# Altium PCB PCB.PcbDoc (part 1 of 2)
Units mil, origin at the board's own origin, x right, y up, seen from the top; angles counter-clockwise.
Board outline 1965.12 x 2985.07 mil, 4 copper layers (Top Layer, digital, gnd, Bottom Layer), stack 23.756 mil thick; 141 components, 79 nets, 449 pads, 482 vias.
Unrouted connection lines stored in the file: 63.
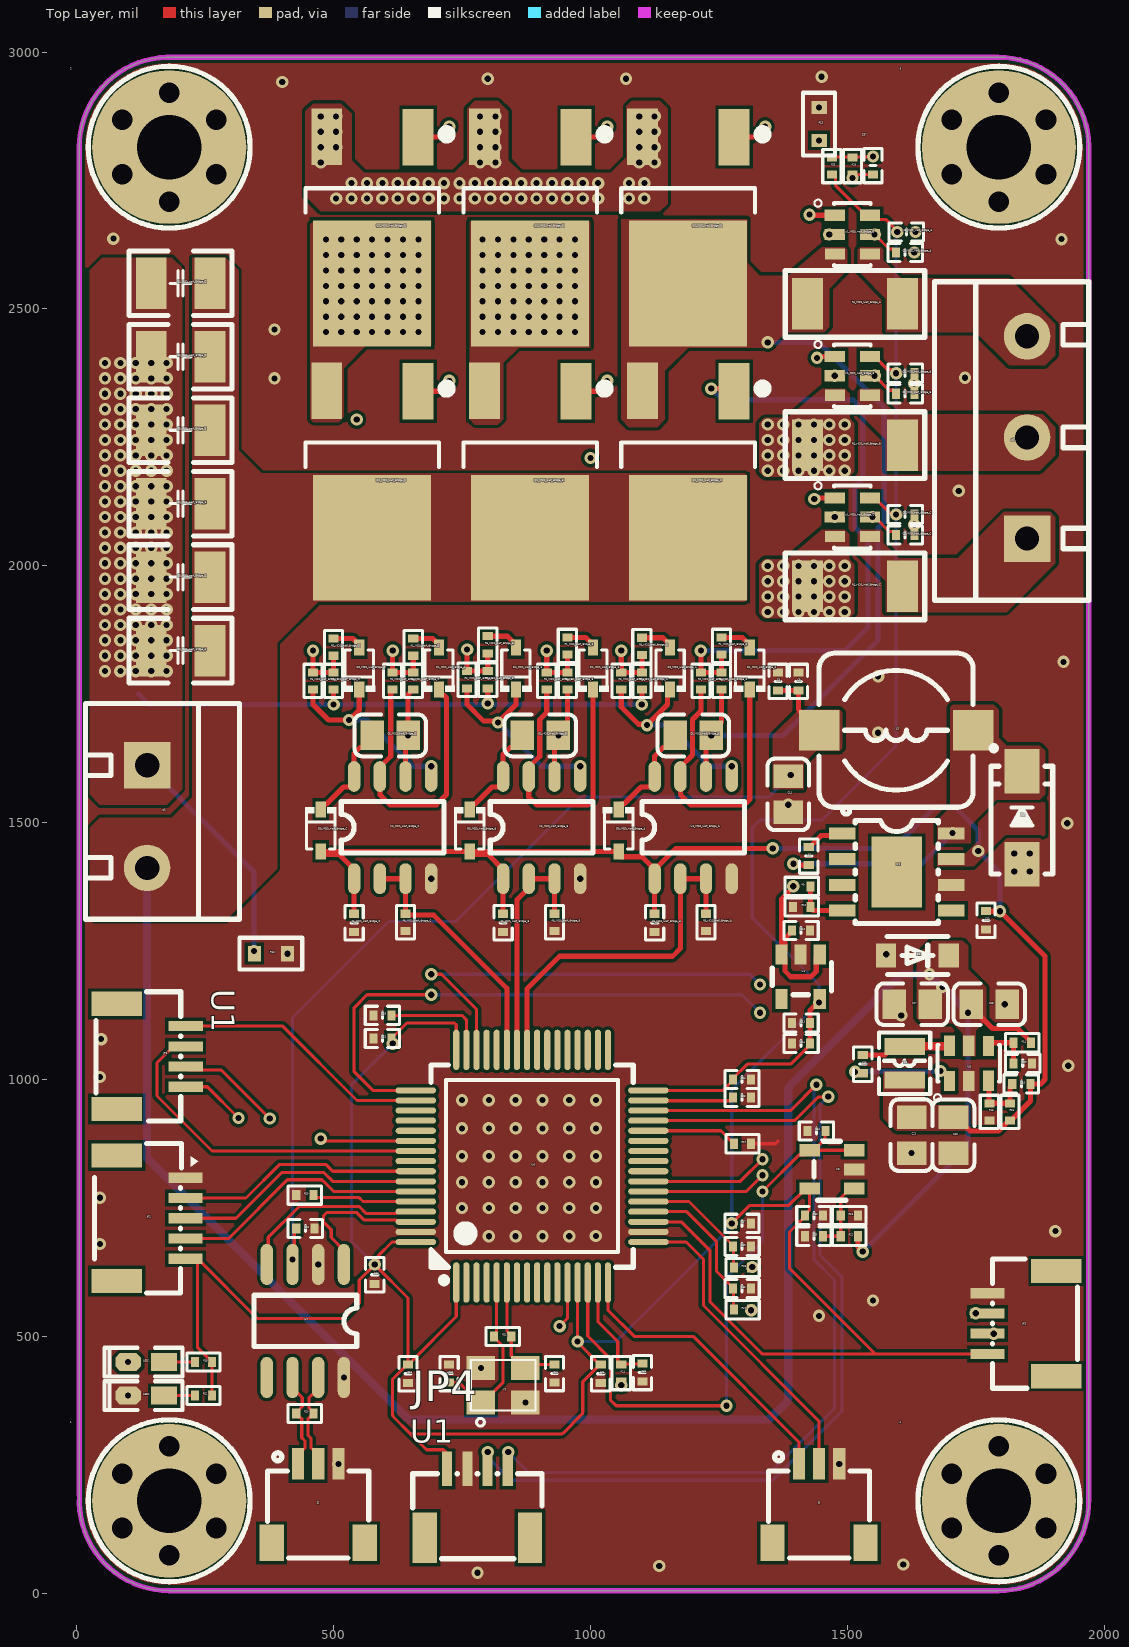
[diagram p0: Top Layer view]
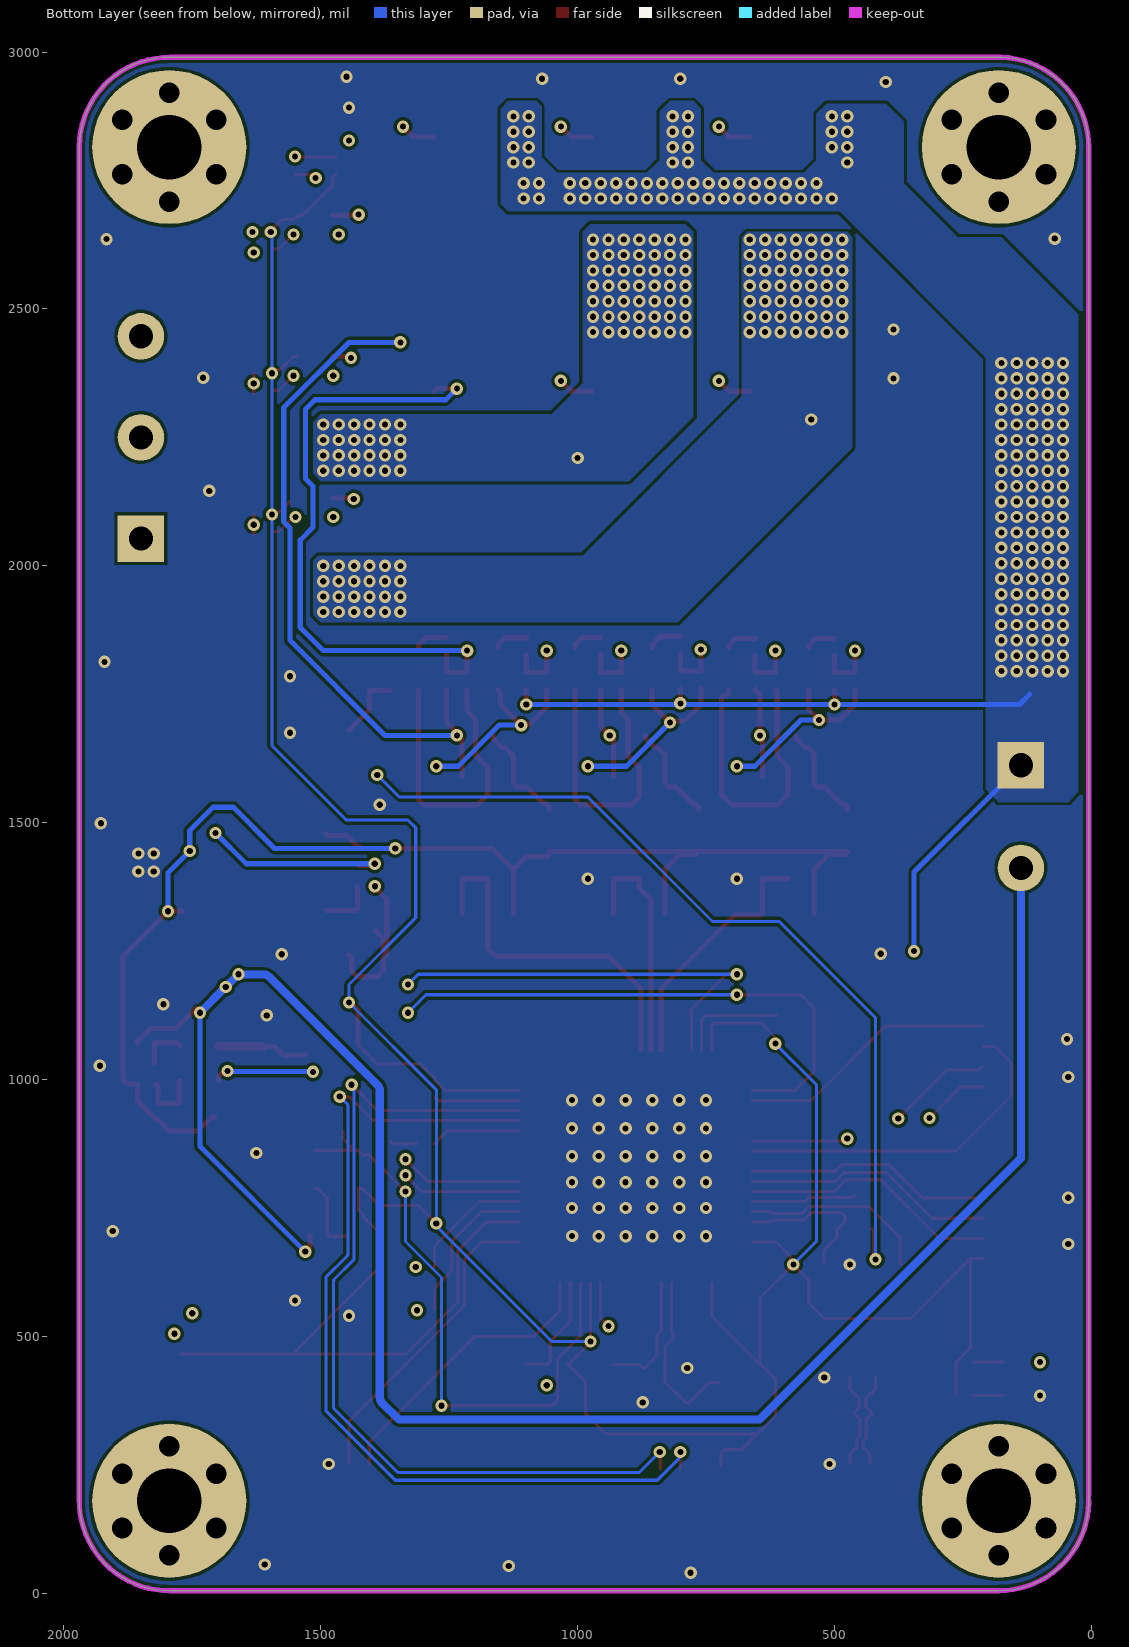
[diagram p1: Bottom Layer view, seen from below]
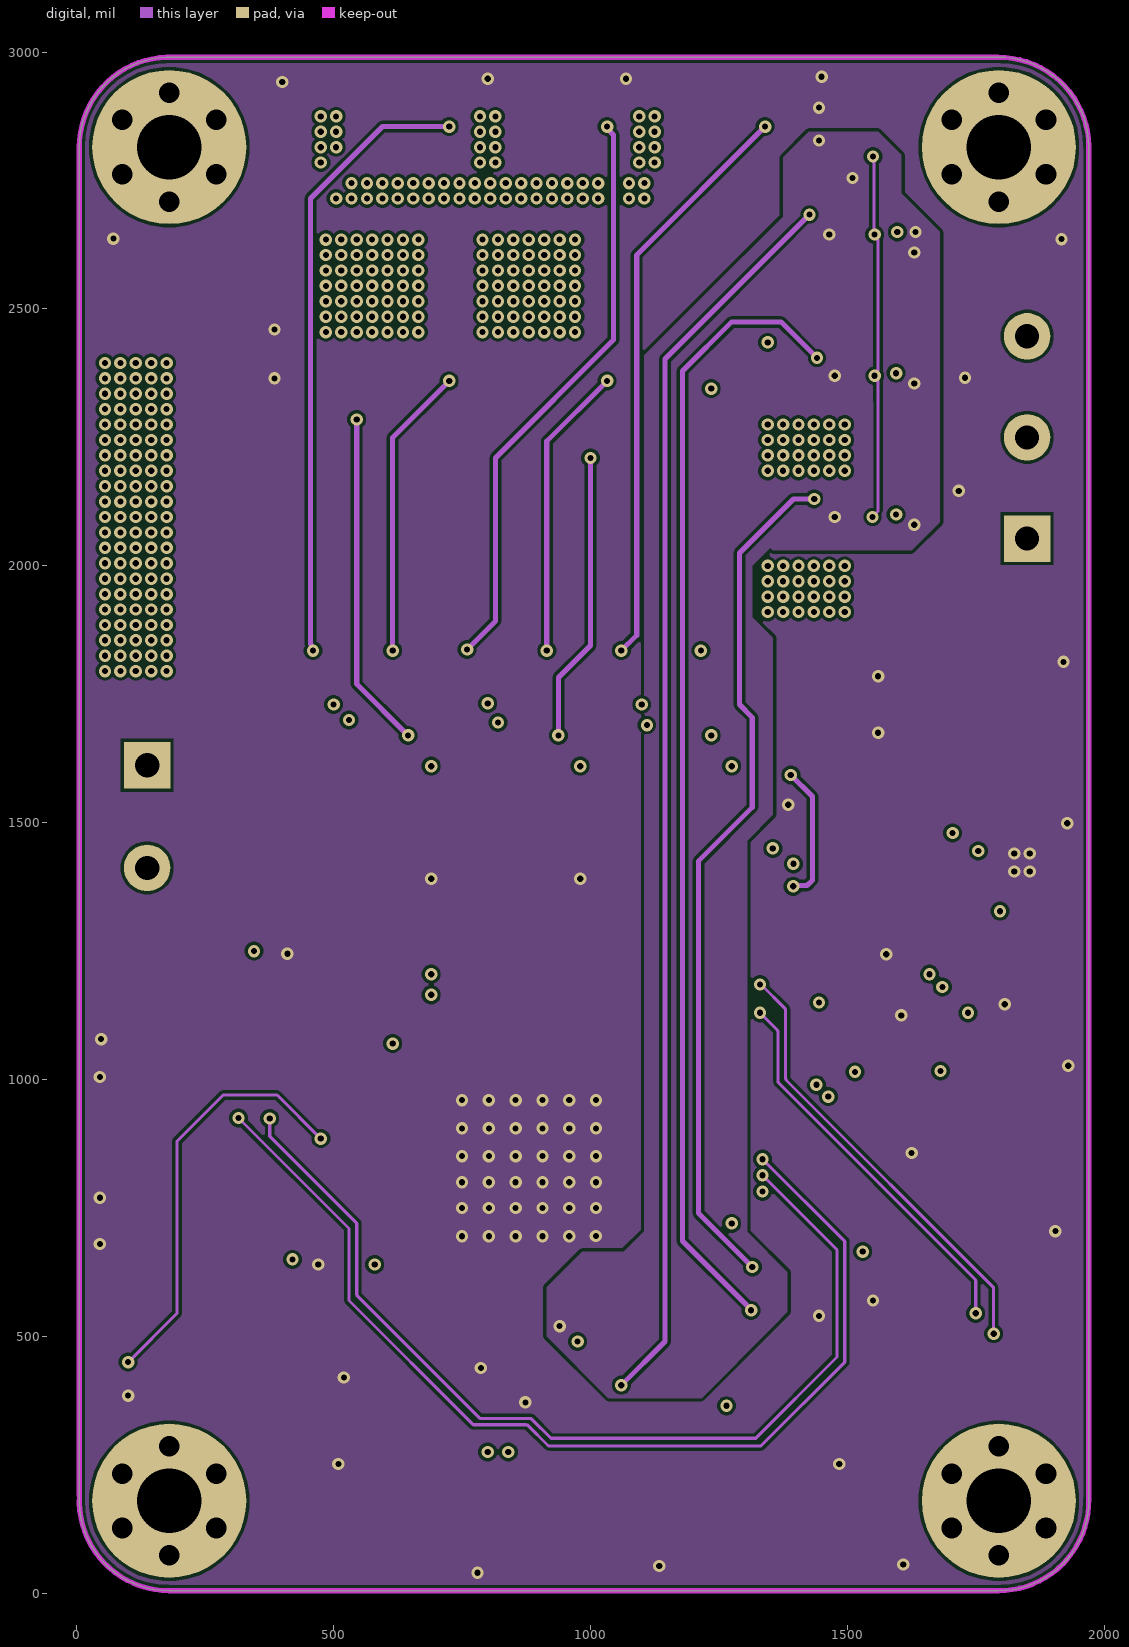
[diagram p2: digital]
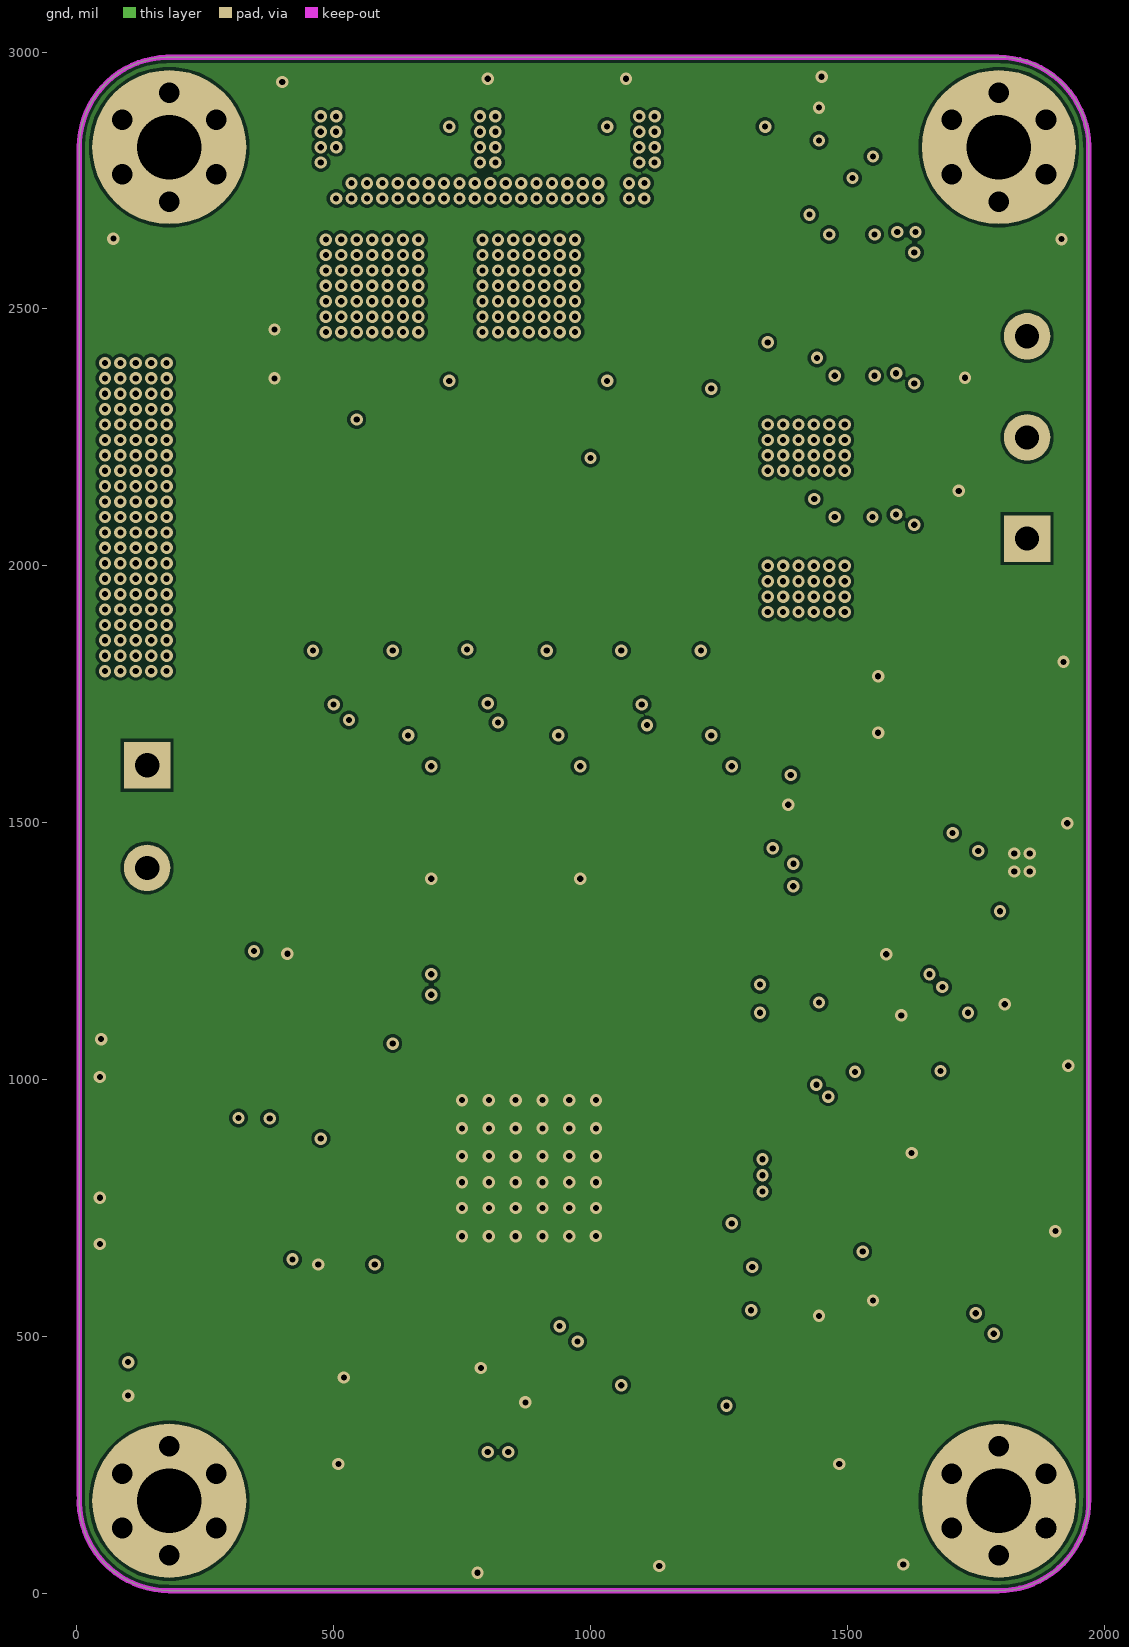
[diagram p3: gnd]

## Layer stack, top to bottom
Top Solder: solder mask 0.4, Solder Resist, Dk 3.5
Top Layer: signal copper 1.4
Dielectric 2: prepreg 2.8, PP-006, Dk 4.1
digital: signal copper 1.378
Dielectric 1: dielectric 12.6, FR-4, Dk 4.8
gnd: signal copper 1.378
Dielectric 3: prepreg 2.8, PP-006, Dk 4.1
Bottom Layer: signal copper 1.4
Bottom Solder: solder mask 0.4, Solder Resist, Dk 3.5

## Board outline
5.21,189.99 5,2815 4.93,2815 cw(c180,2815) 175,2990 1793,2990 cw(c1795,2815) 1970,2816.99 1970.05,2816.99 1970.05,183 cw(c1795,180) 1794,4.93 180,4.93 cw(c180,180)

## Design rules (kind name [scope] priority, off if disabled: settings)
Clearance [All] p1: gap=6 ignorepadtopadclearanceinfootprint=TRUE
DiffPairsRouting DiffPair_DiffPairsRouting [All] p1: maxlimit=6 minlimit=6 mostfreqgap=6 toplayer_minwidth=6 toplayer_maxwidth=6 toplayer_prefwidth=6 midlayer1_minwidth=6 midlayer1_maxwidth=6 midlayer1_prefwidth=6 midlayer2_minwidth=6 midlayer2_maxwidth=6 midlayer2_prefwidth=6 bottomlayer_minwidth=6 bottomlayer_maxwidth=6 bottomlayer_prefwidth=6 maxuncoupledlength=500
MatchedLengths DiffPair_MatchedLengths [InDifferentialPair ('CAN_X')] p1: tolerance=10 checknetsindiffpair=FALSE checkdiffpairvsdiffpair=TRUE checkxsignals=TRUE checkothers=TRUE
MatchedLengths [InDifferentialPair ('CAN_X')] p2: tolerance=1000 checknetsindiffpair=FALSE checkdiffpairvsdiffpair=TRUE checkxsignals=TRUE checkothers=TRUE
MinimumSolderMaskSliver [All] p1 off: minsoldermaskwidth=10
PolygonConnect PolygonConnect_1 [All] p1: connectstyle=Direct reliefconductorwidth=10 reliefentries=4 polygonreliefangle="90 Angle" airgapwidth=10
PolygonConnect [All] p2: connectstyle=Relief reliefconductorwidth=10 reliefentries=4 polygonreliefangle="90 Angle" airgapwidth=10
RoutingVias [All] p1: holewidth=28 width=50 viastyle="Through Hole" minholewidth=28 minwidth=50 maxholewidth=28 maxwidth=50
SilkToSilkClearance [All] p1 off: silktosilkclearance=10
SilkToSolderMaskClearance [IsPad] p1 off: minsilkscreentomaskgap=10 clearancetoexposedcopper=TRUE
SolderMaskExpansion [All] p1 off: expansion=4 istentingtop=FALSE
Width [All] p1: maxlimit=20 minlimit=4 preferedwidth=6
26 further rules are at their usual default settings.

## Classes and differential pairs
component class control: 1 2 3 4
channel class single_bridge: MOS_Half_Bridge_A MOS_Half_Bridge_B MOS_Half_Bridge_C
component class slyFOC_module: C33 C34 C35 C36 C37 C38 C39 JP2 JP3 JP4 p2 R22 R23 R24 R25 R26 R27 R28 U8
component class my_Power: C7 C8 C9 C10 C11 C12 C13 C14 C15 C16 C17 C18 C19 C20 C21 D4 D5 L1 L2 LED1 p1 R9 R10 R11 R12 R13 R14 R15 R16 U3 U4 U5
component class MOS_Half_Bridge_C: C1_MOS_Half_Bridge_C C2_MOS_Half_Bridge_C C3_MOS_Half_Bridge_C C4_MOS_Half_Bridge_C C5_MOS_Half_Bridge_C C6_MOS_Half_Bridge_C D1_MOS_Half_Bridge_C D2_MOS_Half_Bridge_C D3_MOS_Half_Bridge_C Q1_MOS_Half_Bridge_C Q2_MOS_Half_Bridge_C R1_MOS_Half_Bridge_C R2_MOS_Half_Bridge_C R3_MOS_Half_Bridge_C R4_MOS_Half_Bridge_C R5_MOS_Half_Bridge_C R6_MOS_Half_Bridge_C R7_MOS_Half_Bridge_C R8_MOS_Half_Bridge_C U1_MOS_Half_Bridge_C U2_MOS_Half_Bridge_C
component class MOS_Half_Bridge_B: C1_MOS_Half_Bridge_B C2_MOS_Half_Bridge_B C3_MOS_Half_Bridge_B C4_MOS_Half_Bridge_B C5_MOS_Half_Bridge_B C6_MOS_Half_Bridge_B D1_MOS_Half_Bridge_B D2_MOS_Half_Bridge_B D3_MOS_Half_Bridge_B Q1_MOS_Half_Bridge_B Q2_MOS_Half_Bridge_B R1_MOS_Half_Bridge_B R2_MOS_Half_Bridge_B R3_MOS_Half_Bridge_B R4_MOS_Half_Bridge_B R5_MOS_Half_Bridge_B R6_MOS_Half_Bridge_B R7_MOS_Half_Bridge_B R8_MOS_Half_Bridge_B U1_MOS_Half_Bridge_B U2_MOS_Half_Bridge_B
component class MOS_Half_Bridge_A: C1_MOS_Half_Bridge_A C2_MOS_Half_Bridge_A C3_MOS_Half_Bridge_A C4_MOS_Half_Bridge_A C5_MOS_Half_Bridge_A C6_MOS_Half_Bridge_A D1_MOS_Half_Bridge_A D2_MOS_Half_Bridge_A D3_MOS_Half_Bridge_A Q1_MOS_Half_Bridge_A Q2_MOS_Half_Bridge_A R1_MOS_Half_Bridge_A R2_MOS_Half_Bridge_A R3_MOS_Half_Bridge_A R4_MOS_Half_Bridge_A R5_MOS_Half_Bridge_A R6_MOS_Half_Bridge_A R7_MOS_Half_Bridge_A R8_MOS_Half_Bridge_A U1_MOS_Half_Bridge_A U2_MOS_Half_Bridge_A
component class MCU: C22 C23 C24 C25 C26 C27 C28 C29 C30 C31 C32 J1 J2 JP1 LED2 R17 R18 R19 R20 R21 U6 U7 Y1
differential pair CAN: +CAN_P -CAN_N
differential pair CAN_X: +CAN_X_P -CAN_X_N

## Components (designator, comment, footprint, x,y, rotation, side; value= is the part's Value field where it differs from the comment)
1 "M3" M3x9+6_N 180,180 r90 top
2 "M3" M3x9+6_N 180,2815 r90 top
3 "M3" M3x9+6_N 1795,2815 r90 top
4 "M3" M3x9+6_N 1795,180 r90 top
C1_MOS_Half_Bridge_A "0402/0.1uF" 0402C 1615,2650 r180 top value=0.1uF (schematic designator C1)
C1_MOS_Half_Bridge_B "0402/0.1uF" 0402C 1612.72,2375 r180 top value=0.1uF (schematic designator C1)
C1_MOS_Half_Bridge_C "0402/0.1uF" 0402C 1612.72,2100 r180 top value=0.1uF (schematic designator C1)
C2_MOS_Half_Bridge_A "0402/0.1uF" 0402C 1612.72,2610 r0 top value=0.1uF (schematic designator C2)
C2_MOS_Half_Bridge_B "0402/0.1uF" 0402C 1612.72,2335 r0 top value=0.1uF (schematic designator C2)
C2_MOS_Half_Bridge_C "0402/0.1uF" 0402C 1612.72,2060 r0 top value=0.1uF (schematic designator C2)
C3_MOS_Half_Bridge_A "1210/10uF 63V 10%" 1210C 202.09,1978 r0 top value="10uF 63V 10%" (schematic designator C3)
C3_MOS_Half_Bridge_B "1210/10uF 63V 10%" 1210C 202.09,2264 r0 top value="10uF 63V 10%" (schematic designator C3)
C3_MOS_Half_Bridge_C "1210/10uF 63V 10%" 1210C 202.09,2407 r0 top value="10uF 63V 10%" (schematic designator C3)
C4_MOS_Half_Bridge_A "1210/10uF 63V 10%" 1210C 202.09,1835 r0 top value="10uF 63V 10%" (schematic designator C4)
C4_MOS_Half_Bridge_B "1210/10uF 63V 10%" 1210C 202.09,2121 r0 top value="10uF 63V 10%" (schematic designator C4)
C4_MOS_Half_Bridge_C "1210/10uF 63V 10%" 1210C 202.09,2550 r0 top value="10uF 63V 10%" (schematic designator C4)
C5_MOS_Half_Bridge_A "0805/150nF/50V" 0805C 1200,1670 r0 top value=150nF/50V (schematic designator C5)
C5_MOS_Half_Bridge_B "0805/150nF/50V" 0805C 902.52,1670 r0 top value=150nF/50V (schematic designator C5)
C5_MOS_Half_Bridge_C "0805/150nF/50V" 0805C 610.04,1670 r0 top value=150nF/50V (schematic designator C5)
C6_MOS_Half_Bridge_A "0402/0.1uF" 0402C 1125,1305 r90 top value=0.1uF (schematic designator C6)
C6_MOS_Half_Bridge_B "0402/0.1uF" 0402C 830,1305 r90 top value=0.1uF (schematic designator C6)
C6_MOS_Half_Bridge_C "0402/0.1uF" 0402C 540,1305 r90 top value=0.1uF (schematic designator C6)
C7 "0402/104" 0402C 1425,1435 r90 top value=104
C8 "0402/103" 0402C 1405,1775 r270 top value=103
C9 "0402/104" 0402C 1365,1775 r270 top value=104
C10 "0402/104" 0402C 1770,1310 r90 top value=104
C11 "0805/4.7uF/50V" 0805C 1385,1555.04 r90 top value=4.7uF/50V
C12 "0402/2.2uF" 0402C 1410,1290 r180 top value=2.2uF
C13 "0402/2.2uF" 0402C 1410,1110 r0 top value=2.2uF
C14 "0402/104" 0402C 1410,1070 r0 top value=104
C15 "0402/104/10%/50V" 0402C 1530,1030 r270 top value=104/10%/50V
C16 "0402/47pF/25V" 0402C 1838.8,991.57 r0 top value=47pF/25V
C17 "0805/4.7uF/50V" 0805C 1626.52,1146.56 r0 top value=4.7uF/50V
C18 "0805/4.7uF/50V" 0805C 1776.52,1146.56 r180 top value=4.7uF/50V
C19 "0402/104/25V" 0402C 1841.52,1031.56 r180 top value=104/25V
C20 "0805/4.7uF/50V" 0805C 1706.52,891.56 r90 top value=4.7uF/50V
C21 "0805/104/50V" 0805C 1625.27,891.94 r90 top value=104/50V
C22 "104" 0402C 580,620 r270 top
C23 "104" 0402C 595,1080 r180 top
C24 "104" 0402C 1295,1000 r0 top
C25 "104" 0402C 1020,427.28 r270 top
C26 "104" 0402C 645,427.28 r270 top
C27 "104" 0402C 1295,720 r0 top
C28 "2.2uF/0402" 0402C 1295,965 r180 top
C29 "2.2uF/0402" 0402C 595,1125 r0 top
C30 "18pF/0402" 0402C 725,427.59 r270 top
C31 "18pF/0402" 0402C 930,427.59 r270 top
C32 "104" 0402C 445,710 r180 top
C33 "0402/104/10V" 0402C 1435,735 r180 top value=104/10V
C34 "0402/104/10V" 0402C 1440,900 r180 top value=104/10V
C35 "0402/104/10V" 0402C 1435,695 r0 top value=104/10V
C36 "0402/2.2nF" 0402C 1101,429.59 r90 top value=2.2nF
C37 "0402/104" 0402C 1550,2779.25 r270 top value=104
C38 "0402/2.2nF" 0402C 1295.1,593 r180 top value=2.2nF
C39 "0402/2.2nF" 0402C 1295.1,675 r180 top value=2.2nF
D1_MOS_Half_Bridge_A "B16WS" SOD-323 1310,1800 r270 top (schematic designator D1)
D1_MOS_Half_Bridge_B "B16WS" SOD-323 1005,1800 r270 top (schematic designator D1)
D1_MOS_Half_Bridge_C "B16WS" SOD-323 705,1800 r270 top (schematic designator D1)
D2_MOS_Half_Bridge_A "B16WS" SOD-323 1155,1800 r270 top (schematic designator D2)
D2_MOS_Half_Bridge_B "B16WS" SOD-323 855,1800 r270 top (schematic designator D2)
D2_MOS_Half_Bridge_C "B16WS" SOD-323 550,1800 r270 top (schematic designator D2)
D3_MOS_Half_Bridge_A "B16WS" SOD-323 1055,1485 r90 top (schematic designator D3)
D3_MOS_Half_Bridge_B "B16WS" SOD-323 765,1485 r90 top (schematic designator D3)
D3_MOS_Half_Bridge_C "B16WS" SOD-323 475,1485 r90 top (schematic designator D3)
D4 "SS54" SMA 1840,1510 r90 top
D5 "SMF30A" SOD-123F 1636.52,1241.56 r180 top
J1 "SH1.0-3P UART" SH1.0_3P-P1.00-H3.00 1445,175 r0 top
J2 "SH1.0-3P" SH1.0_3P-P1.00-H3.00 470,175 r0 top
JP1 "SH1.0-4P" SH1.0-P1.00_-4P 1840,525 r90 top
JP2 "SH1.0-5" SH1.0-5P-P1.00 144.81,730 r270 top
JP3 "SH1.0-4" SH1.0-P1.00_-4P 145,1045 r270 top
JP4 "SH1.0-4" SH1.0-P1.00_-4P 780,175 r0 top
L1 "33uH" CDRH73 1595,1680 r180 top
L2 "4.7UH FPA252012D-4R7MT0" NR2520 1611.52,1031.56 r270 top
LED1 "RED" "LED 0603R" 135,385 r180 top
LED2 "BLUE" "LED 0603B" 135,450.26 r180 top
p1 "HEAD2" KF301-5.0-2P 137,1412 r270 top
p2 "HEAD3" KF301-5.0-3P 1850,2250 r90 top
Q1_MOS_Half_Bridge_A "NCE6050KA" TO252 1190,2220 r180 top (schematic designator Q1)
Q1_MOS_Half_Bridge_B "NCE6050KA" TO252 882.5,2220 r180 top (schematic designator Q1)
Q1_MOS_Half_Bridge_C "NCE6050KA" TO252 575,2220 r180 top (schematic designator Q1)
Q2_MOS_Half_Bridge_A "NCE6050KA" TO252 1190,2715 r180 top (schematic designator Q2)
Q2_MOS_Half_Bridge_B "NCE6050KA" TO252 882.5,2715 r180 top (schematic designator Q2)
Q2_MOS_Half_Bridge_C "NCE6050KA" TO252 575,2715 r180 top (schematic designator Q2)
R1_MOS_Half_Bridge_A "0402/0R" 0402R 1255,1845 r270 top value=0R (schematic designator R1)
R1_MOS_Half_Bridge_B "0402/0R" 0402R 955,1845 r270 top value=0R (schematic designator R1)
R1_MOS_Half_Bridge_C "0402/0R" 0402R 655,1842.71 r270 top value=0R (schematic designator R1)
R2_MOS_Half_Bridge_A "0402/2.2R" 0402R 1215,1775 r90 top value=2.2R (schematic designator R2)
R2_MOS_Half_Bridge_B "0402/2.2R" 0402R 915,1775 r90 top value=2.2R (schematic designator R2)
R2_MOS_Half_Bridge_C "0402/2.2R" 0402R 615,1775 r90 top value=2.2R (schematic designator R2)
R3_MOS_Half_Bridge_A "0402/10K" 0402R 1255,1775 r90 top value=10K (schematic designator R3)
R3_MOS_Half_Bridge_B "0402/10K" 0402R 955,1775 r90 top value=10K (schematic designator R3)
R3_MOS_Half_Bridge_C "0402/10K" 0402R 655,1775 r90 top value=10K (schematic designator R3)
R4_MOS_Half_Bridge_A "2010/1mR 1% 1W" 2010R 1515,2510 r180 top value="1mR 1% 1W" (schematic designator R4)
R4_MOS_Half_Bridge_B "2010/1mR 1% 1W" 2010R 1515,2235 r180 top value="1mR 1% 1W" (schematic designator R4)
R4_MOS_Half_Bridge_C "2010/1mR 1% 1W" 2010R 1515,1960 r180 top value="1mR 1% 1W" (schematic designator R4)
R5_MOS_Half_Bridge_A "0402/0R" 0402R 1100,1844.25 r270 top value=0R (schematic designator R5)
R5_MOS_Half_Bridge_B "0402/0R" 0402R 800,1847.29 r270 top value=0R (schematic designator R5)
R5_MOS_Half_Bridge_C "0402/0R" 0402R 500,1842.71 r270 top value=0R (schematic designator R5)
R6_MOS_Half_Bridge_A "0402/2.2R" 0402R 1060,1775 r90 top value=2.2R (schematic designator R6)
R6_MOS_Half_Bridge_B "0402/2.2R" 0402R 760,1777.29 r90 top value=2.2R (schematic designator R6)
R6_MOS_Half_Bridge_C "0402/2.2R" 0402R 460,1775 r90 top value=2.2R (schematic designator R6)
R7_MOS_Half_Bridge_A "0402/10K" 0402R 1100,1775 r90 top value=10K (schematic designator R7)
R7_MOS_Half_Bridge_B "0402/10K" 0402R 800,1777.29 r90 top value=10K (schematic designator R7)
R7_MOS_Half_Bridge_C "0402/10K" 0402R 500,1775 r90 top value=10K (schematic designator R7)
R8_MOS_Half_Bridge_A "0402/4.7K" 0402R 1225,1305 r90 top value=4.7K (schematic designator R8)
R8_MOS_Half_Bridge_B "0402/4.7K" 0402R 930,1305 r90 top value=4.7K (schematic designator R8)
R8_MOS_Half_Bridge_C "0402/4.7K" 0402R 640,1305 r90 top value=4.7K (schematic designator R8)
R9 "0402/10K" 0402R 1410.42,1376.15 r0 top value=10K
R10 "0402/3.3K" 0402R 1412.38,1336.15 r180 top value=3.3K
R11 "0R" 0603R 1445,2860 r90 top
R12 "0402/510R" 0402R 247.71,385 r180 top value=510R
R13 "0R" 0603R 378,1245 r0 top
R14 "0402/120R" 0402R 1841.52,1071.56 r180 top value=120R
R15 "0402/47K" 0402R 1816.52,938 r270 top value=47K
R16 "0402/3.3K" 0402R 1776.59,936.04 r90 top value=3.3K
R17 "100K/0402" 0402R 1295,875 r0 top
R18 "0402/510R" 0402R 247.71,450 r180 top value=510R
R19 "100K/0402" 0402R 445,775 r180 top
R20 "0402/120R" 0402R 445,350 r180 top value=120R
R21 "1M/0402" 0402R 830,500 r180 top
R22 "0402/18K" 0402R 1503.04,695 r0 top value=18K
R23 "0402/1K" 0402R 1505,735 r180 top value=1K
R24 "0402/0R" 0402R 1060,429.59 r270 top value=0R
R25 "0402/10K" 0402R 1470,2777.29 r90 top value=10K
R26 "0402/10K" 0402R 1510,2779.25 r270 top value=10K
R27 "0402/0R" 0402R 1295.1,552 r0 top value=0R
R28 "0402/0R" 0402R 1295.1,634 r0 top value=0R
U1_MOS_Half_Bridge_A "INA181A2IDBVR" SOT23-6 1510,2645 r90 top (schematic designator U1)
U1_MOS_Half_Bridge_B "INA181A2IDBVR" SOT23-6 1510,2370 r90 top (schematic designator U1)
U1_MOS_Half_Bridge_C "INA181A2IDBVR" SOT23-6 1510,2095 r90 top (schematic designator U1)
U2_MOS_Half_Bridge_A "EG2103" "SOP8 - short" 1124,1382 r90 top (schematic designator U2)
U2_MOS_Half_Bridge_B "EG2103" "SOP8 - short" 829,1382 r90 top (schematic designator U2)
U2_MOS_Half_Bridge_C "EG2103" "SOP8 - short" 539,1382 r90 top (schematic designator U2)
U3 "TPS5430" SOIC-8-EP 1596.25,1404.01 r0 top
U4 "RT9013-33GB" SOT-23-5 1409,1199.96 r180 top
U5 "RY8411" SOT23-6 1736.52,1031.56 r180 top
U6 "STM32F405RGT6" LQFP-64_L10.0-W10.0-P0.50-LS12.0-BL 886.42,831.37 r0 top
U7 "TJA1050T" SOP8 521,639 r270 top
U8 "LMV321" SOT-23-5 1470,825 r90 top
Y1 "25MHz" CRY4_3225 830,405 r0 top

## Footprints (in the part's own frame and the unit in brackets; to place one, negate y for a bottom-side part, rotate by r counter-clockwise, add the part's x,y. Pads: shape width x height; smd on the part's side, far side on the other; paste and mask are expansions set on the pad)
0402C [mm] "无极性贴片电容"
  rect 0.4x0.5 smd: 1(-0.45,0) 2(0.45,0)
  silkscreen extent -0.85,-0.45 0.85,0.45, body extent -0.5,-0.26 0.5,0.26, height 0.53
0402R [mm] "1/16W贴片电阻"
  rect 0.4x0.5 smd: 1(-0.4,0) 2(0.45,0)
  silkscreen extent -0.8,-0.45 0.85,0.45, body extent -0.5,-0.25 0.5,0.25, height 0.3
0603R [mil]
  rect 25x30 smd: 1(-32,0) 2(32,0)
  silkscreen extent -61,-31 61,31, body extent -32,-16 31,16, height 18
0805C [mm]
  rect 1.16x1.47 smd: 1(-0.89,0) 2(0.89,0)
  silkscreen extent -1.77,-1.04 1.77,1.04, body extent -1,-0.62 1,0.63, height 0.77
1210C [mil] "无极性贴片电容"
  rect 60x100 smd: 1(-57.09,0) 2(57.09,0)
  silkscreen extent -100,-63 100,63, body extent -63,-51 63,51, height 60
2010R [mm] "3/4W贴片电阻"
  rect 1.52x2.54 smd: 1(-2.35,0) 2(2.35,0)
  silkscreen extent -3.45,-1.65 3.45,1.65, body extent -2.5,-1.25 2.5,1.25, height 0.55
CDRH73 [mm] "7.3*7.3*3.4mm（长宽高）"
  rect 2x2 smd: 1(-3.81,0) 2(3.81,0)
  silkscreen extent -3.81,-3.81 3.81,3.81, body extent -3.65,-3.65 3.65,3.65, height 3.65
CRY4_3225 [mm] "3225四脚晶振"
  rect 1.4x1.2 smd mask+0.05: 1(-1.1,-0.85) 2(1.1,-0.85) 3(1.1,0.85) 4(-1.1,0.85)
  silkscreen extent -1.6,-2.02 1.6,1.25, body extent -1.6,-1.25 1.6,1.25, height 0.7
KF301-5.0-2P [mm] "可拼接端子/6A"
  rect 2.3x2.3 hole 1.2: 1(-5.08,0)
  round 2.3 hole 1.2: 2(0,0)
  silkscreen extent -8.13,-3.05 2.54,4.57, body extent -7.95,-3 2.55,4.6, height 10.05
KF301-5.0-3P [mm] "可拼接端子/6A"
  rect 2.3x2.3 hole 1.2: 1(-5,0)
  round 2.3 hole 1.2: 2(0,0) 3(5,0)
  silkscreen extent -8.05,-3.05 7.7,4.57, body extent -7.87,-3 7.63,4.6, height 10.05
"LED 0603B" [mil] "蓝色0603LED"
  rect 50x35 smd: 1(-35,0.26)
  oct 50x35 smd: 2(35,0.26)
  silkscreen extent -71,-28 81,28, body extent -31,-16 32,16, height 24
"LED 0603R" [mil] "红色0603LED"
  rect 50x35 smd: 1(-35,0.26)
  oct 50x35 smd: 2(35,0.26)
  silkscreen extent -71,-28 81,28, body extent -31,-16 31,16, height 18
LQFP-64_L10.0-W10.0-P0.50-LS12.0-BL [mm]
  oval 0.3x2 smd: 1(-3.75,-5.75) 2(-3.25,-5.75) 3(-2.75,-5.75) 4(-2.25,-5.75) 5(-1.75,-5.75) 6(-1.25,-5.75) 7(-0.75,-5.75) 8(-0.25,-5.75) 9(0.25,-5.75) 10(0.75,-5.75) 11(1.25,-5.75) 12(1.75,-5.75) 13(2.25,-5.75) 14(2.75,-5.75) 15(3.25,-5.75) 16(3.75,-5.75) 33(3.75,5.75) 34(3.25,5.75) 35(2.75,5.75) 36(2.25,5.75) 37(1.75,5.75) 38(1.25,5.75) 39(0.75,5.75) 40(0.25,5.75) 41(-0.25,5.75) 42(-0.75,5.75) 43(-1.25,5.75) 44(-1.75,5.75) 45(-2.25,5.75) 46(-2.75,5.75) 47(-3.25,5.75) 48(-3.75,5.75)
  oval 2x0.3 smd: 17(5.75,-3.75) 18(5.75,-3.25) 19(5.75,-2.75) 20(5.75,-2.25) 21(5.75,-1.75) 22(5.75,-1.25) 23(5.75,-0.75) 24(5.75,-0.25) 25(5.75,0.25) 26(5.75,0.75) 27(5.75,1.25) 28(5.75,1.75) 29(5.75,2.25) 30(5.75,2.75) 31(5.75,3.25) 32(5.75,3.75) 49(-5.75,3.75) 50(-5.75,3.25) 51(-5.75,2.75) 52(-5.75,2.25) 53(-5.75,1.75) 54(-5.75,1.25) 55(-5.75,0.75) 56(-5.75,0.25) 57(-5.75,-0.25) 58(-5.75,-0.75) 59(-5.75,-1.25) 60(-5.75,-1.75) 61(-5.75,-2.25) 62(-5.75,-2.75) 63(-5.75,-3.25) 64(-5.75,-3.75)
  silkscreen extent -5,-5.79 5,5, body extent -6,-6 6,6, height 1.45
M3x9+6_N [mil] "M3铜柱，长：9mm，螺纹长：6mm"
  round 40 hole 40: 1(-106,0) 1(-53,91.8) 1(-53,-91.8) 1(53,91.8) 1(53,-91.8) 1(106,0)
  round 300 hole 125: 1(0,0)
  silkscreen extent -157,-157 157,157, body extent -106,-93 106,93, height 356
NR2520 [mm] "2.5mm*2.0mm*1.0mm(长*宽*高）"
  rect 0.85x2 smd: 1(-0.825,0) 2(0.825,0)
  silkscreen extent -1.52,-1.27 1.52,1.27, body extent -1.25,-1 1.25,1, height 0.7
SH1.0-5P-P1.00 [mm]
  rect 0.5x1.7 smd paste+0 mask+0.05: 1(-2,1.7) 2(-1,1.7) 3(0,1.7) 4(1,1.7) 5(2,1.7)
  rect 1.2x2.5 smd paste+0 mask+0.05: 6(3.1,-1.7) 7(-3.1,-1.7)
  silkscreen extent -3.7,-2.8 3.7,2.34, body extent -3.68,-2.81 3.68,2.24, height 3.2
SH1.0-P1.00_-4P [mm]
  rect 0.5x1.7 smd paste+0 mask+0.05: 1(-1.5,1.705) 2(-0.5,1.705) 3(0.5,1.705) 4(1.5,1.705)
  rect 1.2x2.5 smd paste+0 mask+0.05: 5(-2.6,-1.705) 6(2.6,-1.705)
  silkscreen extent -3.2,-2.74 3.2,1.46, body extent -3.18,-2.74 3.18,2.31, height 3.2
SH1.0_3P-P1.00-H3.00 [mm]
  rect 1.2x1.8 smd paste+0 mask+0.05: 0(-2.3,-1.95) 0(2.3,-1.95)
  rect 0.6x1.55 smd paste+0 mask+0.05: 1(-1,1.95) 2(0,1.95) 3(1,1.95)
  silkscreen extent -2.5,-2.7 2.5,2.5, body extent -2.5,-2.71 2.5,2.24, height 2.95
SMA [mm] "4.5x2.6*2.2mm（长宽高，不包括引脚）"
  rect 2.2x1.75 smd: 1(-2.3,0) 2(2.3,0)
  silkscreen extent -2.79,-1.52 3.56,1.52, body extent -2.53,-1.3 2.58,1.3, height 2.15
SOD-123F [mm]
  rect 1x1.2 smd: 1(-1.55,0) 2(1.55,0)
  silkscreen extent -1.52,-0.93 1.49,0.95, body extent -1.85,-0.9 1.85,0.9, height 1.11
SOD-323 [mm]
  rect 0.78x0.5 smd: 1(-1.04,0) 2(1.04,0)
  silkscreen extent -0.93,-0.78 1.15,0.78, body extent -1.3,-0.65 1.3,0.65, height 1
SOIC-8-EP [mm]
  rect 1.3x0.6 smd: 1(-2.7,1.905) 2(-2.7,0.635) 3(-2.7,-0.635) 4(-2.7,-1.905) 5(2.7,-1.905) 6(2.7,-0.635) 7(2.7,0.635) 8(2.7,1.905)
  rect 2.5x3.5 smd: 9(0,0)
  silkscreen extent -2.67,-2.55 2.05,3.2, body extent -3.07,-2.48 2.97,2.54, height 1.6
SOP8 [mil]
  oval 80x24 smd: 1(-1,-1) 2(-1,-51) 3(-1,-101) 4(-1,-151) 5(219,-151) 6(219,-101) 7(219,-51) 8(219,-1)
  silkscreen extent 59,-176 159,24, body extent -4,-174 234,24, height 63
"SOP8 - short" [mil]
  oval 60x24 smd: 1(9,-1) 2(9,-51) 3(9,-101) 4(9,-151) 5(208,-151) 6(208,-101) 7(208,-51) 8(208,-1)
  silkscreen extent 59,-176 159,24, body extent -10,-174 228,24, height 63
SOT23-6 [mm] "SOT-23/SC-74A; 5 Leads; Body 3.1 x 3 mm, inc. leads (LxW max)"
  rect 0.55x1 smd: 1(0.95,0.872) 2(0,0.872) 3(-0.965,0.864) 4(-0.965,-0.864) 5(0,-0.872) 6(0.95,-0.872)
  silkscreen extent -1.55,-0.9 1.73,1.88, body extent -1.43,-1.2 1.49,1.14, height 1
SOT-23-5 [mm]
  rect 0.6x1 smd paste+0 mask+0.05: 1(-0.95,-1.1) 2(0,-1.1) 3(0.95,-1.1) 4(0.95,1.1) 5(-0.95,1.1)
  silkscreen extent -1.52,-0.7 1.4,0.89, body extent -1.39,-1.45 1.39,1.45, height 1.2
TO252 [mil] "252晶体管"
  rect 60x110 smd: 1(-89.55,-119.77) 3(88.45,-120.77)
  rect 230x245 smd: 2(0,165.35)
  silkscreen extent -153,-133 130,28, body extent -128,-120 128,251, height 91

## Part data
1 2 3 4: "铜柱孔", BOM名称=铜柱孔
C1_MOS_Half_Bridge_A C1_MOS_Half_Bridge_B C1_MOS_Half_Bridge_C C2_MOS_Half_Bridge_A C2_MOS_Half_Bridge_B C2_MOS_Half_Bridge_C C3_MOS_Half_Bridge_A C3_MOS_Half_Bridge_B C3_MOS_Half_Bridge_C C4_MOS_Half_Bridge_A C4_MOS_Half_Bridge_B C4_MOS_Half_Bridge_C C5_MOS_Half_Bridge_A C5_MOS_Half_Bridge_B C5_MOS_Half_Bridge_C C6_MOS_Half_Bridge_A C6_MOS_Half_Bridge_B C6_MOS_Half_Bridge_C C7 C8 C9 C10 C11 C12 C13 C14 C15 C16 C17 C18 C19 C20 C21 C22 C23 C24 C25 C26 C27 C28 C29 C30 C31 C32 C33 C34 C35 C36 C37 C38 C39: library part C, "贴片电容"
  C1_MOS_Half_Bridge_A C1_MOS_Half_Bridge_B C1_MOS_Half_Bridge_C C2_MOS_Half_Bridge_A C2_MOS_Half_Bridge_B C2_MOS_Half_Bridge_C C6_MOS_Half_Bridge_A C6_MOS_Half_Bridge_B C6_MOS_Half_Bridge_C C7 C9 C10 C14 C15 C19 C33 C34 C35 C37: 嘉立创元件编号=C110251
  C3_MOS_Half_Bridge_A C3_MOS_Half_Bridge_B C3_MOS_Half_Bridge_C C4_MOS_Half_Bridge_A C4_MOS_Half_Bridge_B C4_MOS_Half_Bridge_C: 嘉立创元件编号=C437568
  C5_MOS_Half_Bridge_A C5_MOS_Half_Bridge_B C5_MOS_Half_Bridge_C: 嘉立创元件编号=C376934
  C8: 嘉立创元件编号=C15195
  C11 C17 C18 C20: 嘉立创元件编号=C2991173
  C12 C13: 嘉立创元件编号=C12530
  C16: 嘉立创元件编号=C60137
  C21: 嘉立创元件编号=C38141
  C22 C23 C24 C25 C26 C27 C32: BOM名称=无极性贴片电容, 嘉立创元件编号=C110251
  C28 C29: BOM名称=无极性贴片电容, 嘉立创元件编号=C12530
  C30 C31: BOM名称=无极性贴片电容, 嘉立创元件编号=C5137554
  C36 C38 C39: 嘉立创元件编号=C2987940
D1_MOS_Half_Bridge_A D1_MOS_Half_Bridge_B D1_MOS_Half_Bridge_C D2_MOS_Half_Bridge_A D2_MOS_Half_Bridge_B D2_MOS_Half_Bridge_C D3_MOS_Half_Bridge_A D3_MOS_Half_Bridge_B D3_MOS_Half_Bridge_C: "肖特基二极管 60V 1A", 嘉立创元件编号=C7420327
D4: library part "SS54(DO-214AC )", "续流二极管", 嘉立创元件编号=C7420369
D5: "TVS二极管 静电和浪涌保护 30V", 嘉立创元件编号=C19077518
J1 J2: library part 3p_G, "3针排针", 嘉立创元件编号=C7430445
JP1 JP3 JP4: library part 4p_G, "4针排针", BOM名称=4P接插件, 嘉立创元件编号=C7430446
  JP3 JP4: 学习资源=www.ooocke.com, 版权归属=源创客
JP2: library part 5p_G, "5针排针", BOM名称=4P接插件, 嘉立创元件编号=C3029344, 学习资源=www.ooocke.com, 版权归属=源创客
L1: library part L-CDRH, "功率屏蔽电感", BOM名称=功率屏蔽电感, 嘉立创元件编号=C5339524
L2: library part L, "小功率贴片电感", 嘉立创元件编号=C5289265
LED1 LED2: library part LED, "RED 蓝、红"
  LED1: 嘉立创元件编号=C125100
  LED2: 嘉立创元件编号=C84267
p1: "接线端子2P", 嘉立创元件编号=C474881
p2: "接线端子3P", 嘉立创元件编号=C474882
Q1_MOS_Half_Bridge_A Q1_MOS_Half_Bridge_B Q1_MOS_Half_Bridge_C Q2_MOS_Half_Bridge_A Q2_MOS_Half_Bridge_B Q2_MOS_Half_Bridge_C: "N沟场效应管60V50A", BOM名称=N沟场效应管, 嘉立创元件编号=C96013
R1_MOS_Half_Bridge_A R1_MOS_Half_Bridge_B R1_MOS_Half_Bridge_C R2_MOS_Half_Bridge_A R2_MOS_Half_Bridge_B R2_MOS_Half_Bridge_C R3_MOS_Half_Bridge_A R3_MOS_Half_Bridge_B R3_MOS_Half_Bridge_C R4_MOS_Half_Bridge_A R4_MOS_Half_Bridge_B R4_MOS_Half_Bridge_C R5_MOS_Half_Bridge_A R5_MOS_Half_Bridge_B R5_MOS_Half_Bridge_C R6_MOS_Half_Bridge_A R6_MOS_Half_Bridge_B R6_MOS_Half_Bridge_C R7_MOS_Half_Bridge_A R7_MOS_Half_Bridge_B R7_MOS_Half_Bridge_C R8_MOS_Half_Bridge_A R8_MOS_Half_Bridge_B R8_MOS_Half_Bridge_C R9 R10 R12 R14 R15 R16 R17 R18 R19 R20 R21 R22 R23 R24 R25 R26 R27 R28: library part R, "贴片电阻"
  R1_MOS_Half_Bridge_A R1_MOS_Half_Bridge_B R1_MOS_Half_Bridge_C R5_MOS_Half_Bridge_A R5_MOS_Half_Bridge_B R5_MOS_Half_Bridge_C R24 R27 R28: 嘉立创元件编号=C17168
  R2_MOS_Half_Bridge_A R2_MOS_Half_Bridge_B R2_MOS_Half_Bridge_C R6_MOS_Half_Bridge_A R6_MOS_Half_Bridge_B R6_MOS_Half_Bridge_C: 嘉立创元件编号=C25101
  R3_MOS_Half_Bridge_A R3_MOS_Half_Bridge_B R3_MOS_Half_Bridge_C R7_MOS_Half_Bridge_A R7_MOS_Half_Bridge_B R7_MOS_Half_Bridge_C R9 R25 R26: 嘉立创元件编号=C25744
  R4_MOS_Half_Bridge_A R4_MOS_Half_Bridge_B R4_MOS_Half_Bridge_C: 嘉立创元件编号=C2094559
  R8_MOS_Half_Bridge_A R8_MOS_Half_Bridge_B R8_MOS_Half_Bridge_C: 嘉立创元件编号=C25900
  R10 R16: 嘉立创元件编号=C25890
  R12 R18: 嘉立创元件编号=C25123
  R14 R20: 嘉立创元件编号=C2909315
  R15: 嘉立创元件编号=C25792
  R17 R19: BOM名称=贴片电阻, 嘉立创元件编号=C25741
  R21: BOM名称=贴片电阻, 嘉立创元件编号=C26083
  R22: 嘉立创元件编号=C138044
  R23: 嘉立创元件编号=C11702
R11 R13: library part R, "贴片电阻 0603", BOM名称=贴片电阻, 嘉立创元件编号=C2906974
U1_MOS_Half_Bridge_A U1_MOS_Half_Bridge_B U1_MOS_Half_Bridge_C: "单路，高共模电压，50V/V电流放大器", 嘉立创元件编号=C2058784
U2_MOS_Half_Bridge_A U2_MOS_Half_Bridge_B U2_MOS_Half_Bridge_C: "大功率栅极驱动器", 嘉立创元件编号=C480654
U3: "DCDC开关电源芯片", 嘉立创元件编号=C9864
U4: "LDO 5V TO 3.3V", 嘉立创元件编号=C47773
U5: "DCDC降压芯片 42V输入 1.2A", 嘉立创元件编号=C2935411
U7: "CAN通信芯片", 嘉立创元件编号=C21714366
U8: "运放", 嘉立创元件编号=C7972
Y1: library part CRYSTAL_4P, "4脚晶振", 嘉立创元件编号=C70593
U6: 嘉立创元件编号=C15742

## Via types
v1: diameter 24, hole 12, Top Layer to Bottom Layer, tented both sides, 482 vias

## Nets (pads, with @x,y where several pads share a name; then routed paths per layer and width w, separated by ;. In a path a pad name is that pad's centre, name@x,y a point inside that pad or via, vN(x,y) a via of type N, cw(c..) or ccw(c..) an arc to the next point about the centre after c; other vN are vias at no path point)
+1.65: C2_MOS_Half_Bridge_A.1 C2_MOS_Half_Bridge_B.1 C2_MOS_Half_Bridge_C.1 C37.1 R25.2 R26.1 U1_MOS_Half_Bridge_A.5 U1_MOS_Half_Bridge_B.5 U1_MOS_Half_Bridge_C.5 | length 995.6
  Top Layer w6: R25.2@1470,2795 1470.98,2795.98 1549.02,2795.98 v1(1550,2796.97) ; U1_MOS_Half_Bridge_C.5@1544.32,2095 1553.18,2095 1581.34,2066.84 1590.13,2066.84 1595,2061.97 C2_MOS_Half_Bridge_C.1@1595,2060 ; U1_MOS_Half_Bridge_B.5@1544.32,2370 v1(1553.18,2370) 1581.33,2341.85 1590.13,2341.85 1595,2336.97 C2_MOS_Half_Bridge_B.1@1595,2335 ; U1_MOS_Half_Bridge_A.5@1544.32,2645 v1(1553.18,2645) 1581.34,2616.84 1590.13,2616.84 1595,2611.97 C2_MOS_Half_Bridge_A.1@1595,2610
  digital w6: v1(1549,2095) 1549,2095.69 1560,2106.69 1560,2358.31 1553.18,2365.13 v1(1553.18,2370) ; v1(1550,2796.97) 1551.59,2795.37 1551.59,2646.59 v1(1553.18,2645) 1553.18,2640.13 1560,2633.31 1560,2435 1560,2381.69 1554.4,2376.09 v1@1554.4,2370
A: JP2.3 U6.58 | length 492.3
  Top Layer w6: JP2.3@211.74,730 310,730 398.99,818.99 481.01,818.99 498.16,801.84 U6.58@660.05,801.84
AGND: C1_MOS_Half_Bridge_A.1 C1_MOS_Half_Bridge_B.1 C1_MOS_Half_Bridge_C.1 C2_MOS_Half_Bridge_A.2 C2_MOS_Half_Bridge_B.2 C2_MOS_Half_Bridge_C.2 C37.2 R11.1 R26.2 U1_MOS_Half_Bridge_A.2 U1_MOS_Half_Bridge_B.2 U1_MOS_Half_Bridge_C.2 U6.12 | length 214.1
  Top Layer w6: v1(940,520) 955.32,535.32 U6.12@955.32,605 ; v1(1510,2755) 1514.87,2755 1521.41,2761.54 C37.2@1550,2761.54 ; C2_MOS_Half_Bridge_C.2@1630.43,2060 C1_MOS_Half_Bridge_C.1@1630.43,2100 ; C2_MOS_Half_Bridge_B.2@1630.43,2335 C1_MOS_Half_Bridge_B.1@1630.43,2375
  other v1: 1630.43,2080 1475.68,2095 1630.43,2355 1475.68,2370 1630.43,2610 1465,2645 1632.72,2650 1445,2828
B: JP2.4 U6.59 | length 505.1
  Top Layer w6: JP2.4@211.74,690.63 295.63,690.63 410,805 477.5,805 500.34,782.16 U6.59@660.05,782.16
CAN_N: J2.1 R20.2 U7.6 | length 197.7
  Top Layer w6: U7.6@420,420 420,396.87 428.32,388.56 431.44,388.56 439,381 439,363.69 427.29,351.97 R20.2@427.29,350 427.29,348.03 432.16,343.16 434.5,343.16 438.02,339.65 438.02,302.56 444.32,296.27 444.32,282.8 440.8,279.28 439.44,279.28 430.63,270.47 J2.1@430.63,251.77
CAN_P: J2.2 R20.1 U7.7 | length 195
  Top Layer w6: J2.2@470,251.77 470,270.47 461.19,279.28 459.83,279.28 456.32,282.8 456.32,301.24 450.02,307.54 450.02,339.65 453.53,343.16 455.88,343.16 460.75,348.03 460.75,351.97 451.9,360.82 451.9,380 460.45,388.56 461.69,388.56 470,396.87 U7.7@470,420
CAN_X_N: U6.61 U7.4 | length 373.4
  Top Layer w6: U7.4@370,640 372.85,642.85 372.85,692.85 432.84,752.84 549.98,752.84 563.88,738.95 621.17,738.95 625.01,742.79 U6.61@660.05,742.79
CAN_X_P: U6.62 U7.1 | length 301.1
  Top Layer w6: U7.1@520,640 520,668 495.44,692.56 495.44,707.72 480,723.16 480,734.52 486.32,740.84 545.01,740.84 558.91,726.95 621.17,726.95 625.01,723.1 U6.62@660.05,723.1
CUR_A: R24.2 U1_MOS_Half_Bridge_A.1 | length 2482.2
  Top Layer w10: v1@1425,2685 v1(1426.3,2683.7) 1427.6,2682.4 U1_MOS_Half_Bridge_A.1@1475.68,2682.4
  digital w10: v1(1060,405) 1145,490 1145,2402.4 v1(1426.3,2683.7)
CUR_B: R27.2 U1_MOS_Half_Bridge_B.1 | length 2250.5
  Top Layer w10: v1@1440,2405 1442.4,2407.4 U1_MOS_Half_Bridge_B.1@1475.68,2407.4
  digital w10: v1@1313.48,551.52 1179.14,685.86 1179.14,2379.14 1275,2475 1370.9,2475 v1(1441,2404.9)
  other v1: 1312.76,550.79
CUR_C: R28.2 U1_MOS_Half_Bridge_C.1 | length 1718.2
  Top Layer w10: v1@1435,2130 1437.4,2132.4 U1_MOS_Half_Bridge_C.1@1475.68,2132.4
  digital w10: v1(1315,635) 1210,740 1210,1425 1315,1530 1315,1705 1290,1730 1290,2025 1395.16,2130.16 v1(1435.61,2130.16)
DCBUS_RES: C35.2 R22.1 R23.2 U8.1 | length 142.6
  Top Layer w6: C35.2@1452.71,695 R22.1@1487.29,695 R23.2@1487.29,735 1487.29,769.45 1505.44,787.6 U8.1@1513.31,787.6
GH_MOS_Half_Bridge_A: D1_MOS_Half_Bridge_A.2 R2_MOS_Half_Bridge_A.1 U2_MOS_Half_Bridge_A.7 | length 582.3
  Top Layer w10: R2_MOS_Half_Bridge_A.1@1215,1759.25 1215,1717.29 1198.8,1701.08 1198.8,1631.8 1175,1608 U2_MOS_Half_Bridge_A.7@1175,1590 1175,1555 1195,1535 1300,1535 1310,1545 D1_MOS_Half_Bridge_A.2@1310,1759.06
GH_MOS_Half_Bridge_B: D1_MOS_Half_Bridge_B.2 R2_MOS_Half_Bridge_B.1 U2_MOS_Half_Bridge_B.7 | length 573.2
  Top Layer w10: R2_MOS_Half_Bridge_B.1@915,1759.25 915,1714.77 901.31,1701.08 901.31,1629.31 880,1608 U2_MOS_Half_Bridge_B.7@880,1590 880,1550 895,1535 995,1535 1005,1545 D1_MOS_Half_Bridge_B.2@1005,1759.06
GH_MOS_Half_Bridge_C: D1_MOS_Half_Bridge_C.2 R2_MOS_Half_Bridge_C.1 U2_MOS_Half_Bridge_C.7 | length 574.5
  Top Layer w10: R2_MOS_Half_Bridge_C.1@615,1759.25 614.12,1759.25 611.24,1756.37 611.24,1629.24 590,1608 U2_MOS_Half_Bridge_C.7@590,1590 590.59,1589.41 590.59,1554.41 610,1535 700,1535 720,1555 720,1742.85 714.14,1748.71 709.84,1748.71 705,1753.55 D1_MOS_Half_Bridge_C.2@705,1759.06
GL_MOS_Half_Bridge_A: D2_MOS_Half_Bridge_A.2 R6_MOS_Half_Bridge_A.1 U2_MOS_Half_Bridge_A.5 | length 384.6
  Top Layer w10: R6_MOS_Half_Bridge_A.1@1060,1759.25 1060,1725 1093.41,1691.59 1108.41,1691.59 v1(1110,1690) 1150.16,1730.16 1150.16,1754.22 D2_MOS_Half_Bridge_A.2@1155,1759.06
  Bottom Layer w10: v1(1110,1690) 1152.5,1690 1232.5,1610 v1(1275,1610)
GL_MOS_Half_Bridge_B: D2_MOS_Half_Bridge_B.2 R6_MOS_Half_Bridge_B.1 U2_MOS_Half_Bridge_B.5 | length 379.8
  Top Layer w10: R6_MOS_Half_Bridge_B.1@760,1761.54 760,1730 792.32,1697.68 817.32,1697.68 v1(820,1695) 855,1730 D2_MOS_Half_Bridge_B.2@855,1759.06
  Bottom Layer w10: v1(820,1695) 905,1610 v1(980,1610)
GL_MOS_Half_Bridge_C: D2_MOS_Half_Bridge_C.2 R6_MOS_Half_Bridge_C.1 U2_MOS_Half_Bridge_C.5 | length 376.3
  Top Layer w10: R6_MOS_Half_Bridge_C.1@460,1759.25 460,1730 490,1700 v1(530,1700) 550,1720 D2_MOS_Half_Bridge_C.2@550,1759.06
  Bottom Layer w10: v1(530,1700) 565,1700 655,1610 v1(690,1610)
GND: C6_MOS_Half_Bridge_A.1 C6_MOS_Half_Bridge_B.1 C6_MOS_Half_Bridge_C.1 C8.1 C9.1 C10.1 C11.1 C12.1 C13.1 C14.1 C17.1 C18.1 C19.1 C20.1 C21.1 C22.2 C23.2 C24.2 C25.2 C26.2 C27.2 C28.1 C29.1 C30.1 C31.2 C32.1 C33.1 C34.2 C35.1 C36.1 C38.1 C39.1 D4.1 D5.2 J1.3 J2.3 JP1.4 JP2.1 JP4.2 LED1.2 R8_MOS_Half_Bridge_A.1 R8_MOS_Half_Bridge_B.1 R8_MOS_Half_Bridge_C.1 R10.2 R11.2 R13.2 R16.1 R17.2 R19.2 R23.1 U2_MOS_Half_Bridge_A.4 U2_MOS_Half_Bridge_B.4 U2_MOS_Half_Bridge_C.4 U3.6 U4.2 U5.2 U6.18 U6.63 U7.2 U7.8 U8.2 Y1.2 Y1.4 | length 54.4
  Top Layer w6: R17.2@1312.71,875 1360,875 1365,880
  other v1: 780,40 1134,53 1609,56 509.37,251.77 1484.37,251.77 873.31,371.54 100,384.74 520,420 786.69,438.46 1445,540 1550,570 470,640 45,680 750,695 802.19,695 854.38,695 906.57,695 958.77,695 1010.63,695.33 1905,705 750,750 802.19,750 854.38,750 906.57,750 958.77,750 1010.96,750 45,770 750,800 802.19,800 854.38,800 906.57,800 958.77,800 1010.96,800 750,851 802.19,851 854.38,851 906.57,851 958.77,851 1010.96,851 1625.27,856.9 750,905 802.19,905 854.38,905 906.57,905 958.77,905 1010.96,905 750,960 802.19,960 854.38,960 906.57,960 958.77,960 1010.96,960 45,1005 1930,1027 47.44,1078.73 1605,1125 1806.39,1146.54 1575.93,1243.96 410,1245 690,1391 980,1391 1825,1405 1855,1405 1825,1440 1855,1440 1928,1499 1385,1535 1560,1675 1560,1785 1921,1813 1717,2146 385,2365 1729,2366 385,2460 1917,2636 71.26,2637 1445,2892 400,2942 800.16,2948.26 1069.06,2948.26 1450,2952
IN1: R8_MOS_Half_Bridge_A.2 U2_MOS_Half_Bridge_A.2 U2_MOS_Half_Bridge_A.3 U6.41 | length 704
  Top Layer w10: U6.41@876.58,1057.74 876.58,1176.58 940,1240 1160,1240 1175,1255 U2_MOS_Half_Bridge_A.2@1175,1391 U2_MOS_Half_Bridge_A.3@1225,1391 R8_MOS_Half_Bridge_A.2@1225,1322.71
IN2: R8_MOS_Half_Bridge_B.2 U2_MOS_Half_Bridge_B.2 U2_MOS_Half_Bridge_B.3 U6.42 | length 461.1
  Top Layer w10: U6.42@856.89,1057.74 856.89,1349.89 880,1373 U2_MOS_Half_Bridge_B.2@880,1391 U2_MOS_Half_Bridge_B.3@930,1391 R8_MOS_Half_Bridge_B.2@930,1322.71
IN3: R8_MOS_Half_Bridge_C.2 U2_MOS_Half_Bridge_C.2 U2_MOS_Half_Bridge_C.3 U6.43 | length 495.6
  Top Layer w10: U2_MOS_Half_Bridge_C.2@590,1391 U2_MOS_Half_Bridge_C.3@640,1391 R8_MOS_Half_Bridge_C.2@640,1322.71 642.71,1320 695,1320 837.21,1177.79 U6.43@837.21,1057.74
INC_SCL: JP4.3 U6.29 | length 1811.7
  Top Layer w6: JP4.3@799.68,242.12 799.68,274.68 v1(800,275) ; U6.29@1112.79,919.95 1394.98,919.95 ccw(c1394.98,925.95) 1399.2,921.69 1441.93,964.41 cw(c1446.15,960.15) 1446.15,966.15 1460.58,966.15 ccw(c1460.57,972.15) v1@1462.88,966.61
  Bottom Layer w6: v1(800,275) 800,270.13 800.68,269.45 cw(c796.44,265.21) 802.44,265.21 802.44,265.05 ccw(c808.44,265.05) 804.18,260.82 811.84,253.16 845,220 1355,220 1490,355 1490,615 1448.76,656.24 cw(c1453,660.49) 1447,660.49 1447,950.82 v1(1462.94,966.76)